# Altium PCB Interface-Board-v4.0.PcbDoc (part 2 of 3)
Units mil, origin at the board's own origin, x right, y up, seen from the top; angles counter-clockwise.
Board outline 1665.35 x 1665.35 mil, 4 copper layers (Top Layer, PWR, GND, Bottom Layer), stack 61.654 mil thick; 98 components, 76 nets, 345 pads, 193 vias.
Unrouted connection lines stored in the file: 69.
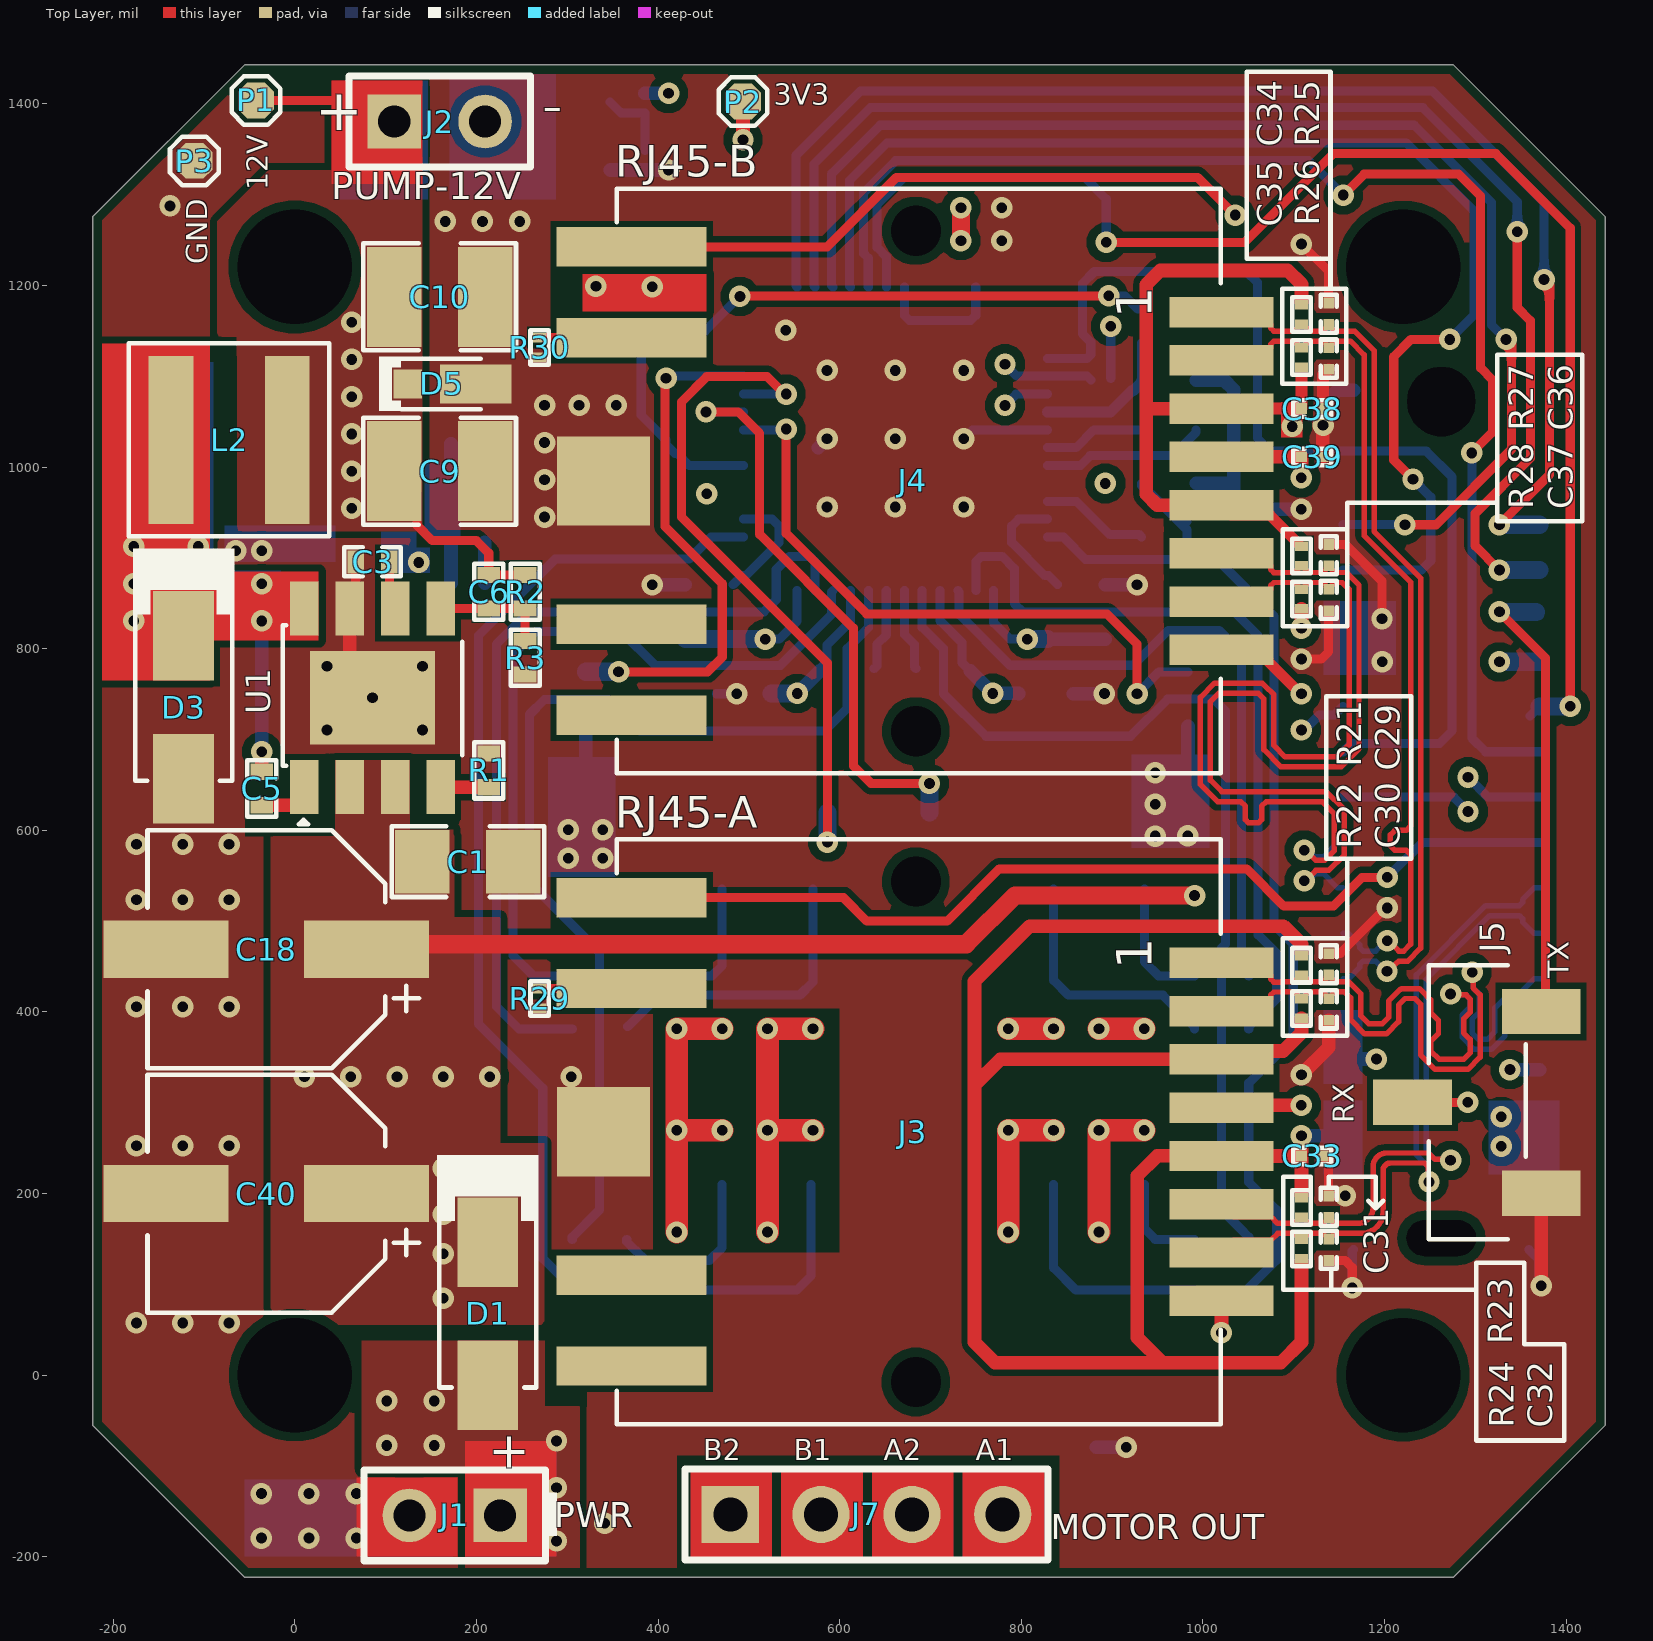
[diagram p0: Top Layer view]

## Part data (continued)
J7: "Gold 250V 3A Straight Square Pins 2.5mm 4P 260℃ 6mm -40℃~+105℃ 3mm 2.54mm Plugin Black Brass 1x4P Plugin,P=2.54mm Pin Headers ROHS", LCSC Part Number=C706876, Manufacturer=XKB, Package=Plugin,P=2.54mm, ComponentLink1Description=LCSC, ComponentLink1URL=https://www.lcsc.com/product-detail/Pin-Headers_XKB-Connectivity-X6511WV-04H-C60D30_C706876.html, Item Type="Male Header", Manufacturer Part Number=X6511WV-04H-C60D30
L1: library part FNR4030S3R9MT, "2.3A 3.9uH ±20% 3.3A SMD,4x4mm Power Inductors ROHS", LCSC Part Number=C167872, Manufacturer=cjiang, ComponentLink1Description=LCSC, ComponentLink1URL=https://www.lcsc.com/product-detail/Power-Inductors_cjiang-Changjiang-Microelectronics-Tech-FNR4030S3R9MT_C167872.html, Item Type=Inductor, Manufacturer Part Number=FNR4030S3R9MT
L2: library part FEXL0550A-150M, "3.9A 15uH Molding Choke ±20% 3.7A SMD,5.5x5.3mm Power Inductors ROHS", LCSC Part Number=C5378518, Manufacturer=cjiang, Package=SMD,5.5x5.3mm, ComponentLink1Description=LCSC, ComponentLink1URL=https://www.lcsc.com/product-detail/Power-Inductors_cjiang-Changjiang-Microelectronics-Tech-FEXL0550A-150M_C5378518.html, Item Type=Inductor, Manufacturer Part Number=FEXL0550A-150M
P1 P2 P3: "Test Point ON", Item Type="Test Point"
Q1: "MOSFET N-CH 20V 4.2A SOT23", LCSC Part Number=C2589, Manufacturer="Infineon Technologies", Package=SOT-23, ComponentLink2Description=LCSC, ComponentLink2URL=https://www.lcsc.com/product-detail/MOSFETs_Infineon-Technologies-IRLML2502TRPBF_C2589.html, Item Type=Mosfet, Manufacturer Part Number=IRLML2502TRPBF
R1: library part RT0402BRD0745K3L, "RES SMD 45.3KOHM 0.1% 1/16W 0402", Case Code (Imperial)=0402, Case Code (Metric)=1005, LCSC Part Number=C852795, Manufacturer=Yageo, Max Operating Temperature=155°C, Max Power Dissipation=63mW, Min Operating Temperature=-55°C, Power Rating=62.5mW, Supplier Part Number=4103245, Temperature Coefficient=25ppm/°C, Tolerance=0.1%, Voltage Rating=50V, Case/Package=0402, Category="Chip SMD Resistors", ComponentLink1Description=https://datasheet.ciiva.com/12796/pyu-rt-1-to-0-05-rohs-l-4-12796102.pdf?src-supplier=Mouser, ComponentLink1URL=https://datasheet.ciiva.com/12796/pyu-rt-1-to-0-05-rohs-l-4-12796102.pdf?src-supplier=Mouser, Height=0.3mm, Item Type=Resistor, Lead Free="Lead Free", Length=1mm, Manufacturer Part Number=RT0402BRD0745K3L, Number of Terminations=2, Packaging="Tape and Reel", Pricing="10000=0.0205, 20000=0.02, 30000=0.0197, 50000=0.0194, 100000=0.0187 (USD)", RoHS=Yes, RoHS Compliant=Yes, Series=RT, Stock=10000, Supplier="Future Electronics", Termination=SMD/SMT, Voltage Rating (DC)=50V, Weight=2.3E-05oz, Width=0.5mm
R2: library part RT0402BRD07150KL, "RES 150K OHM 0.1% 1/16W 0402", LCSC Part Number=C852538, Manufacturer=Yageo, Supplier Part Number=3102901, Category="Chip SMD Resistors", Item Type=Resistor, Manufacturer Part Number=RT0402BRD07150KL, Pricing="10000=0.0218, 20000=0.0213, 30000=0.021, 50000=0.0206, 100000=0.0199 (USD)", RoHS=Yes, RoHS Compliant=Yes, Stock=20000, Supplier="Future Electronics"
R3: library part RT0402BRD0710KL, "RES SMD 10K OHM 0.1% 1/16W 0402", LCSC Part Number=C190095, Manufacturer=Yageo, Supplier Part Number=1236728, Category="Chip SMD Resistors", ComponentLink1Description=https://datasheet.ciiva.com/12836/pyu-rt-1-to-0-05-rohs-l-4-12836454.pdf?src-supplier=Mouser, ComponentLink1URL=https://datasheet.ciiva.com/12836/pyu-rt-1-to-0-05-rohs-l-4-12836454.pdf?src-supplier=Mouser, Item Type=Resistor, Manufacturer Part Number=RT0402BRD0710KL, Pricing="10000=0.0218, 20000=0.0213, 30000=0.021, 50000=0.0206, 100000=0.0199 (USD)", RoHS=Yes, Stock=490000, Supplier="Future Electronics"
R4 R5: library part RC0201FR-0747KL, "RES 47K OHM 1% 1/20W 0201", Case Code (Imperial)=0201, Case Code (Metric)=0603, LCSC Part Number=C138139, Manufacturer=Yageo, Max Operating Temperature=125°C, Max Power Dissipation=50mW, Min Operating Temperature=-55°C, Package Quantity=10000, Resistance Tolerance=1%, Resistor Type="Thick Film", Supplier Part Number=7316417, Temperature Coefficient=200ppm/°C, Voltage Rating=25V, Case/Package=0201, Category="Chip SMD Resistors", ComponentLink1Description=https://datasheet.ciiva.com/7672/1563626-7672232.pdf?src-supplier=Element14, ComponentLink1URL=https://datasheet.ciiva.com/7672/1563626-7672232.pdf?src-supplier=Element14, ComponentLink2Description=https://datasheet.ciiva.com/29710/pyu-r-int-thick-7-29710919.pdf?src-supplier=Digi-Key, ComponentLink2URL=https://datasheet.ciiva.com/29710/pyu-r-int-thick-7-29710919.pdf?src-supplier=Digi-Key, ComponentLink3Description=https://datasheet.ciiva.com/29710/pyu-r-int-thick-7-29710920.pdf?src-supplier=Digi-Key, ComponentLink3URL=https://datasheet.ciiva.com/29710/pyu-r-int-thick-7-29710920.pdf?src-supplier=Digi-Key, ComponentLink4Description=https://datasheet.ciiva.com/25647/pyu-r-int-thick-7-25647310.pdf?src-supplier=Digi-Key, ComponentLink4URL=https://datasheet.ciiva.com/25647/pyu-r-int-thick-7-25647310.pdf?src-supplier=Digi-Key, ComponentLink5Description=https://datasheet.ciiva.com/26829/getdatasheetpartid-422496-26829867.pdf?src-supplier=Verical, ComponentLink5URL=https://datasheet.ciiva.com/26829/getdatasheetpartid-422496-26829867.pdf?src-supplier=Verical, ComponentLink6Description=https://datasheet.ciiva.com/8889/pyu-rc0201-51-rohs-l-8-8889065.pdf?src-supplier=Avnet, ComponentLink6URL=https://datasheet.ciiva.com/8889/pyu-rc0201-51-rohs-l-8-8889065.pdf?src-supplier=Avnet, Construction=Rectangular, Contact Plating=Tin,Matte, Depth=0.3mm, Features="Moisture Resistant", Height=0.01inch, Item Type=Resistor, Lead Free=5697LeadFree, Length=0.6mm, Manufacturer Part Number=RC0201FR-0747KL, Military Standard=Not, Number of Terminations=2, Packaging="Tape and Reel", Power Rating=50mW, Pricing="10000=0.0014, 50000=0.0013, 250000=0.0013, 750000=0.0012, 2000000=0.0011 (USD)", Reach SVHC Compliant=Unknown, RoHS=Yes, RoHS Compliant=Yes, Series=RC, Stock=1020000, Supplier="Future Electronics", Termination=SMD/SMT, Tolerance=1%, Weight=6E-06oz, Width=0.3mm
R6: library part RC0402FR-072R2L, "RES 2.2 OHM 1% 1/16W 0402", Case Code (Imperial)=0402, Case Code (Metric)=1005, LCSC Part Number=C327251, Manufacturer=Yageo, Max Operating Temperature=155°C, Max Power Dissipation=63mW, Min Operating Temperature=-55°C, Resistance Tolerance=1%, Resistor Type="Thick Film", Supplier Part Number 1=311-2.20LRCT-ND, Temperature Coefficient=200ppm/°C, Voltage Rating=50V, Case/Package=0402, Category="Chip SMD Resistors", ComponentLink1Description=https://datasheet.ciiva.com/11808/0900766b80c66297-11808447.pdf?src-supplier=RSComponents, ComponentLink1URL=https://datasheet.ciiva.com/11808/0900766b80c66297-11808447.pdf?src-supplier=RSComponents, ComponentLink2Description=https://datasheet.ciiva.com/7849/1018594-7849944.pdf?src-supplier=Element14, ComponentLink2URL=https://datasheet.ciiva.com/7849/1018594-7849944.pdf?src-supplier=Element14, ComponentLink3Description=https://datasheet.ciiva.com/7849/1018594-7849945.pdf?src-supplier=Element14, ComponentLink3URL=https://datasheet.ciiva.com/7849/1018594-7849945.pdf?src-supplier=Element14, ComponentLink4Description=https://datasheet.ciiva.com/12668/pyu-rc0402-51-rohs-l-6-r-12668221.pdf?src-supplier=Mouser, ComponentLink4URL=https://datasheet.ciiva.com/12668/pyu-rc0402-51-rohs-l-6-r-12668221.pdf?src-supplier=Mouser, ComponentLink5Description=https://datasheet.ciiva.com/17070/pyu-rc0402-51-rohs-l-6-r-17070495.pdf?src-supplier=Future+Electronics, ComponentLink5URL=https://datasheet.ciiva.com/17070/pyu-rc0402-51-rohs-l-6-r-17070495.pdf?src-supplier=Future+Electronics, Depth=0.5mm, Features="Moisture Resistant", Height=0.32mm, Lead Free="Lead Free", Length=1mm, Manufacturer Part Number=RC0402FR-072R2L, Number of Pins=2, Number of Terminations=2, Packaging="Tape and Reel", Power Rating=63mW, Pricing 1="1=0.10000, 10=0.02300, 100=0.00930, 1000=0.00416, 2500=0.00361, 5000=0.00298 (USD)", REACH SVHC="No SVHC", Resistance=2.2R, RoHS=Yes, RoHS Compliant=Yes, Series=RC, Size Code=0402, Stock 1=828995, Supplier 1=Digi-Key, Technology="THICK FILM", Termination=SMD/SMT, Tolerance=1%, Voltage Rating (DC)=50V, Width=0.5mm
R7 R8 R12 R13 R14 R15 R19 R20: library part RC0603FR-0722RL, "RES 22 OHM 1% 1/10W 0603", Case Code (Imperial)=0603, Case Code (Metric)=1608, LCSC Part Number=C107701, Manufacturer=Yageo, Max Operating Temperature=155°C, Max Power Dissipation=100mW, Min Operating Temperature=-55°C, Package Quantity=1, Resistance Tolerance=1%, Resistor Type="Thick Film", Temperature Coefficient=100ppm/°C, Voltage Rating=50V, Case/Package=0603, Category="Chip SMD Resistors", ComponentLink1Description=https://datasheet.ciiva.com/11819/0900766b80f96399-11819285.pdf?src-supplier=RSComponents, ComponentLink1URL=https://datasheet.ciiva.com/11819/0900766b80f96399-11819285.pdf?src-supplier=RSComponents, ComponentLink2Description=https://datasheet.ciiva.com/46395/443971-46395032.pdf?src-supplier=Element14, ComponentLink2URL=https://datasheet.ciiva.com/46395/443971-46395032.pdf?src-supplier=Element14, ComponentLink3Description=https://datasheet.ciiva.com/46440/1868787-46440901.pdf?src-supplier=Element14, ComponentLink3URL=https://datasheet.ciiva.com/46440/1868787-46440901.pdf?src-supplier=Element14, ComponentLink4Description=https://datasheet.ciiva.com/2454/pyu-r-int-thick-7-2454355.pdf?src-supplier=Digi-Key, ComponentLink4URL=https://datasheet.ciiva.com/2454/pyu-r-int-thick-7-2454355.pdf?src-supplier=Digi-Key, ComponentLink5Description=https://datasheet.ciiva.com/2454/pyu-r-int-thick-7-2454356.pdf?src-supplier=Digi-Key, ComponentLink5URL=https://datasheet.ciiva.com/2454/pyu-r-int-thick-7-2454356.pdf?src-supplier=Digi-Key, ComponentLink6Description=https://datasheet.ciiva.com/2454/pyu-r-int-thick-7-2454354.pdf?src-supplier=Digi-Key, ComponentLink6URL=https://datasheet.ciiva.com/2454/pyu-r-int-thick-7-2454354.pdf?src-supplier=Digi-Key, Construction=Rectangular, Depth=0.8mm, Features="Moisture Resistant", Height=0.022inch, Item Type=Resistor, Lead Free="Lead Free", Length=0.063inch, Manufacturer Part Number=RC0603FR-0722RL, Military Standard=Not, Number of Pins=2, Number of Terminations=2, Packaging="Tape and Reel", Power Rating=100mW, Pricing 1="5000=0.00133, 10000=0.00131, 20000=0.00127 (USD)", Reach SVHC Compliant=Yes, Resistance=22R, RoHS=Yes, RoHS Compliant=Yes, Series=RC, Size Code=0603, Stock 1=190000, Supplier 1=Avnet, Supplier Part Number 1=RC0603FR-0722RL, Technology="THICK FILM", Termination=SMD/SMT, Tolerance=1%, Voltage Rating (DC)=50V, Width=0.031inch
R9 R10 R16 R17: library part RC0603FR-0747RL, "RES SMD 47OHM 0.1W 0603", Case Code (Imperial)=0603, Case Code (Metric)=1608, LCSC Part Number=C114623, Manufacturer=Yageo, Max Operating Temperature=155°C, Max Power Dissipation=100mW, Min Operating Temperature=-55°C, Package Quantity=1, Resistance Tolerance=1%, Resistor Type="Thick Film", Supplier Part Number 1=311-47.0HRCT-ND, Temperature Coefficient=100ppm/°C, Voltage Rating=75V, Voltage Rating (DC)=50V, Case/Package=0603, Category="Chip SMD Resistors", ComponentLink1Description=https://datasheet.ciiva.com/2453/pyu-r-int-thick-7-2453922.pdf?src-supplier=Digi-Key, ComponentLink1URL=https://datasheet.ciiva.com/2453/pyu-r-int-thick-7-2453922.pdf?src-supplier=Digi-Key, ComponentLink2Description=https://datasheet.ciiva.com/2453/pyu-r-int-thick-7-2453923.pdf?src-supplier=Digi-Key, ComponentLink2URL=https://datasheet.ciiva.com/2453/pyu-r-int-thick-7-2453923.pdf?src-supplier=Digi-Key, ComponentLink3Description=https://datasheet.ciiva.com/2453/pyu-r-int-thick-7-2453924.pdf?src-supplier=Digi-Key, ComponentLink3URL=https://datasheet.ciiva.com/2453/pyu-r-int-thick-7-2453924.pdf?src-supplier=Digi-Key, ComponentLink4Description=https://datasheet.ciiva.com/7746/443971-7746363.pdf?src-supplier=Element14, ComponentLink4URL=https://datasheet.ciiva.com/7746/443971-7746363.pdf?src-supplier=Element14, ComponentLink5Description=https://datasheet.ciiva.com/7746/443971-7746364.pdf?src-supplier=Element14, ComponentLink5URL=https://datasheet.ciiva.com/7746/443971-7746364.pdf?src-supplier=Element14, ComponentLink6Description=https://datasheet.ciiva.com/46440/1868787-46440908.pdf?src-supplier=Element14, ComponentLink6URL=https://datasheet.ciiva.com/46440/1868787-46440908.pdf?src-supplier=Element14, Construction=Rectangular, Depth=0.8mm, Features="Moisture Resistant", Height=0.022inch, Lead Free="Lead Free", Length=1.6mm, Manufacturer Part Number=RC0603FR-0747RL, Military Standard=Not, Number of Pins=2, Number of Terminations=2, Packaging="Tape and Reel", Power Rating=100mW, Pricing 1="1=0.10000, 10=0.02400, 100=0.00970, 1000=0.00436, 2500=0.00378 (USD)", REACH SVHC=Unknown, Resistance=47R, RoHS=Yes, RoHS Compliant=Yes, Series=RC, Size Code=0603, Stock 1=596562, Supplier 1=Digi-Key, Termination=SMD/SMT, Tolerance=1%, Weight=7.1E-05oz, Width=0.8mm
R11 R18: library part ERJ-8BWFR075V, "RES 0.075 OHM 1% 1W 1206", Case Code (Imperial)=1206, Case Code (Metric)=3216, LCSC Part Number=C2909897, Manufacturer=Panasonic, Max Operating Temperature=155°C, Max Power Dissipation=1W, Min Operating Temperature=-55°C, Package Quantity=5000, Ratings=AEC-Q200, Resistance Tolerance=1%, Resistor Type="Thick Film", Supplier Part Number=667-ERJ-8BWFR075V, Temperature Coefficient=100ppm/°C, Case/Package=1206, Category="Chip SMD Resistors", ComponentLink1Description=https://datasheet.ciiva.com/11810/0900766b8126441d-11810144.pdf?src-supplier=Rs, ComponentLink1URL=https://datasheet.ciiva.com/11810/0900766b8126441d-11810144.pdf?src-supplier=Rs, ComponentLink2Description=https://datasheet.ciiva.com/5901/1662788-5901709.pdf?src-supplier=Farnell, ComponentLink2URL=https://datasheet.ciiva.com/5901/1662788-5901709.pdf?src-supplier=Farnell, ComponentLink3Description=https://datasheet.ciiva.com/7943/1662788-7943643.pdf?src-supplier=Element14, ComponentLink3URL=https://datasheet.ciiva.com/7943/1662788-7943643.pdf?src-supplier=Element14, ComponentLink4Description=https://datasheet.ciiva.com/5901/1662788-5901708.pdf?src-supplier=Farnell, ComponentLink4URL=https://datasheet.ciiva.com/5901/1662788-5901708.pdf?src-supplier=Farnell, ComponentLink5Description=https://datasheet.ciiva.com/24025/aoa0000ce3-72189-24025850.pdf?src-supplier=Mouser, ComponentLink5URL=https://datasheet.ciiva.com/24025/aoa0000ce3-72189-24025850.pdf?src-supplier=Mouser, ComponentLink6Description=https://datasheet.ciiva.com/9187/aoa0000ce3-9187670.pdf?src-supplier=Avnet, ComponentLink6URL=https://datasheet.ciiva.com/9187/aoa0000ce3-9187670.pdf?src-supplier=Avnet, ComponentLink7Description=https://datasheet.ciiva.com/30147/6aoa0000ce3-30147930.pdf?src-supplier=Onlinecomponents.com, ComponentLink7URL=https://datasheet.ciiva.com/30147/6aoa0000ce3-30147930.pdf?src-supplier=Onlinecomponents.com, Contact Plating=Tin, Depth=1.6mm, Features="Automotive AEC-Q200", Height=0.65mm, Item Type="Resistor Current Sense", Lead Free="Lead Free", Length=3.2mm, Manufacturer Part Number=ERJ-8BWFR075V, Mounting Technology="Surface Mount", Number of Terminations=2, Packaging="Tape and Reel", Pins=2, Power Rating=1W, Pricing="1=0.72, 10=0.385, 50=0.385, 100=0.337, 1000=0.215, 10000=0.178 (USD)", RoHS=Yes, Series=ERJ, Stock=148, Supplier=Mouser, Technology="THICK FILM", Termination=SMD/SMT, Tolerance=1%, Width=1.6mm
R21 R22 R23 R24 R25 R26 R27 R28: library part RC0201FR-0749R9L, "RES SMD 49.9 OHM 1% 1/20W 0201", Case Code (Imperial)=0201, Case Code (Metric)=0603, LCSC Part Number=C155744, Manufacturer=Yageo, Max Operating Temperature=125°C, Max Power Dissipation=50mW, Min Operating Temperature=-55°C, Resistor Type="Thick Film", Temperature Coefficient=200ppm/°C, Tolerance=1%, Voltage Rating=25V, Case/Package=0201, Category="Chip SMD Resistors", ComponentLink1Description=http://www.yageo.com/documents/recent/PYu-RC0201_51_RoHS_L_(8).pdf?src-supplier=Mouser, ComponentLink1URL=http://www.yageo.com/documents/recent/PYu-RC0201_51_RoHS_L_(8).pdf?src-supplier=Mouser, ComponentLink2Description=http://www.yageo.com/documents/recent/PYu-RC0201_51_RoHS_L_(8).pdf?src-supplier=Future+Electronics, ComponentLink2URL=http://www.yageo.com/documents/recent/PYu-RC0201_51_RoHS_L_(8).pdf?src-supplier=Future+Electronics, ComponentLink3Description=http://www.yageo.com/documents/recent/PYu-RC_Group_51_RoHS_L_10.pdf?src-supplier=Digi-Key, ComponentLink3URL=http://www.yageo.com/documents/recent/PYu-RC_Group_51_RoHS_L_10.pdf?src-supplier=Digi-Key, ComponentLink4Description=http://www.yageo.com/documents/recent/PYu-RC_Group_51_RoHS_L_9.pdf?src-supplier=Digi-Key, ComponentLink4URL=http://www.yageo.com/documents/recent/PYu-RC_Group_51_RoHS_L_9.pdf?src-supplier=Digi-Key, Construction=Rectangular, Depth=0.3mm, Features="Moisture Resistant", Height=0.01inch, Item Type=Resistor, Lead Free="Lead Free", Length=0.6mm, Manufacturer Part Number=RC0201FR-0749R9L, Military Standard=Not, Number of Terminations=2, Packaging="Tape and Reel", Power Rating=50mW, Pricing 1="10000=0.00128 (USD)", Resistance=49.9R, RoHS=Yes, RoHS Compliant=Yes, Series=RC, Size Code=0201, Stock 1=1020000, Supplier 1=Avnet, Supplier Part Number 1=RC0201FR-0749R9L, Termination=SMD/SMT, Width=0.012inch
R29 R30: library part RC0201DR-07330RL, "RES 330 OHM 0.5% 1/20W 0201", Case/Package=0201, LCSC Part Number=C851717, Manufacturer=Yageo, Max Operating Temperature=125°C, Max Power Dissipation=50mW, Min Operating Temperature=-55°C, Supplier Part Number 1=RC0201DR-07330RL-ND, Temperature Coefficient=200ppm/°C, Tolerance=0.5%, Category="Chip SMD Resistors", ComponentLink1Description=http://www.yageo.com.tw/exep/pages/download/literatures/PYu-R_INT-thick_7.pdf?src-supplier=Digi-Key, ComponentLink1URL=http://www.yageo.com.tw/exep/pages/download/literatures/PYu-R_INT-thick_7.pdf?src-supplier=Digi-Key, Features="Moisture Resistant", Height=0.01inch, Item Type=Resistor, Length=0.024inch, Manufacturer Part Number=RC0201DR-07330RL, Number of Terminations=2, Packaging="Tape and Reel", Pricing 1="10000=0.02267 (USD)", RoHS=Yes, RoHS Compliant=Yes, Series=RC, Supplier 1=Digi-Key, Width=0.012inch
R31: library part RC0201FR-0733RL, "RES 33 OHM 1% 1/20W 0201", LCSC Part Number=C295794, Manufacturer=Yageo, Supplier Part Number=6199285, Category="Chip SMD Resistors", ComponentLink1Description=https://datasheet.ciiva.com/2560/pyu-r-int-thick-7-2560877.pdf?src-supplier=Digi-Key, ComponentLink1URL=https://datasheet.ciiva.com/2560/pyu-r-int-thick-7-2560877.pdf?src-supplier=Digi-Key, ComponentLink2Description=https://datasheet.ciiva.com/2560/pyu-r-int-thick-7-2560878.pdf?src-supplier=Digi-Key, ComponentLink2URL=https://datasheet.ciiva.com/2560/pyu-r-int-thick-7-2560878.pdf?src-supplier=Digi-Key, ComponentLink3Description=https://datasheet.ciiva.com/2560/pyu-r-int-thick-7-2560879.pdf?src-supplier=Digi-Key, ComponentLink3URL=https://datasheet.ciiva.com/2560/pyu-r-int-thick-7-2560879.pdf?src-supplier=Digi-Key, ComponentLink4Description=https://datasheet.ciiva.com/7672/1563626-7672223.pdf?src-supplier=Element14, ComponentLink4URL=https://datasheet.ciiva.com/7672/1563626-7672223.pdf?src-supplier=Element14, ComponentLink5Description=https://datasheet.ciiva.com/22698/1563626-22698520.pdf?src-supplier=Element14, ComponentLink5URL=https://datasheet.ciiva.com/22698/1563626-22698520.pdf?src-supplier=Element14, Item Type=Resistor, Manufacturer Part Number=RC0201FR-0733RL, Pricing="10000=0.0013, 50000=0.0012, 250000=0.0012, 750000=0.0011, 2000000=0.001 (USD)", RoHS=Yes, Stock=1420000, Supplier="Future Electronics"
R32: library part RC0201FR-0710KL, "RES SMD 10K OHM 1% 1/20W 0201", LCSC Part Number=C106225, Manufacturer=Yageo, Package=0201, ComponentLink7Description=LCSC, ComponentLink7URL=https://www.lcsc.com/product-detail/Chip-Resistor-Surface-Mount_YAGEO-RC0201FR-0710KL_C106225.html, Item Type=Resistor, Manufacturer Part Number=RC0201FR-0710KL
U1: "IC REG BUCK ADJUSTABLE 3A 8SOPWR", LCSC Part Number=C136648, Manufacturer="Texas Instruments", Max Operating Temperature=125°C, Min Operating Temperature=-40°C, Quiescent Current=40uA, Supplier Part Number 1=296-47797-1-ND, Category="Voltage Regulators - Switching", ComponentLink1Description=http://www.ti.com/lit/ds/symlink/lmr16030.pdf?src-supplier=Digi-Key, ComponentLink1URL=http://www.ti.com/lit/ds/symlink/lmr16030.pdf?src-supplier=Digi-Key, ComponentLink2Description=http://www.ti.com/general/docs/suppproductinfo.tsp?distId=10&amp;gotoUrl=http%3A%2F%2Fwww.ti.com%2Flit%2Fgpn%2Flmr16030&src-supplier=Digi-Key, ComponentLink2URL=http://www.ti.com/general/docs/suppproductinfo.tsp?distId=10&amp;gotoUrl=http%3A%2F%2Fwww.ti.com%2Flit%2Fgpn%2Flmr16030&src-supplier=Digi-Key, Item Type=IC, Lead Free="Lead Free", Manufacturer Part Number=LMR16030SDDAR, Number of Pins=8, Pricing 1="1=4.08000, 10=3.66300, 25=3.46320, 100=3.00130, 250=2.84736, 500=2.55494, 1000=2.17800 (USD)", RoHS=Yes, RoHS Compliant=Yes, Stock 1=10434, Supplier 1=Digi-Key
U2: "IC REG BUCK 3.3V 2A TSOT26", LCSC Part Number=C780769, Manufacturer=Diodes, Supplier Part Number=6109504, Category="Voltage Regulators - Switching", ComponentLink1Description=https://www.diodes.com/assets/Datasheets/AP63200-AP63201-AP63203-AP63205.pdf?src-supplier=Digi-Key, ComponentLink1URL=https://www.diodes.com/assets/Datasheets/AP63200-AP63201-AP63203-AP63205.pdf?src-supplier=Digi-Key, Item Type=IC, Manufacturer Part Number=AP63203WU-7, Pricing="3000=0.34, 6000=0.335, 9000=0.33, 12000=0.33, 15000=0.32 (USD)", RoHS=Yes, Stock=3000, Supplier="Future Electronics"
U3: "IC MTR DRV BIPOLAR 10-50V 48TQFP", LCSC Part Number=C465948, Manufacturer=Trinamic, Supplier Part Number=700-TMC2160A-TA-T, Item Type=IC, Manufacturer Part Number=TMC2160A-TA-T, Pricing="1=6.21, 10=5.28, 50=5.28, 100=4.57, 1000=3.48, 10000=3.11 (USD)", RoHS=Yes, Stock=9328, Supplier=Mouser
U4 U5 U6 U7: "MOSFET 2N-CH 60V 9.5A 8SOIC", LCSC Part Number=C541719, Manufacturer="Alpha & Omega Semiconductor", Supplier Part Number=785-1792-1-ND, Category=Transistors, ComponentLink1Description=http://www.aosmd.com/res/data_sheets/AOSD62666E.pdf?src-supplier=Digi-Key, ComponentLink1URL=http://www.aosmd.com/res/data_sheets/AOSD62666E.pdf?src-supplier=Digi-Key, ComponentLink2Description=https://datasheet.octopart.com/AOSD62666E-Alpha-%26-Omega-Semiconductor-datasheet-136498378.pdf?src-supplier=LKR, ComponentLink2URL=https://datasheet.octopart.com/AOSD62666E-Alpha-%26-Omega-Semiconductor-datasheet-136498378.pdf?src-supplier=LKR, Item Type=MOSFET, Manufacturer Part Number=AOSD62666E, Pricing="1=1.11, 10=0.911, 100=0.7084, 500=0.60046, 1000=0.48914 (USD)", RoHS=No, Stock=12025, Supplier=Digi-Key

## Free pads (board coordinates)
  round 0 hole 125.98: MH2(0,0) MH3(0,1220.47) MH3(1220.47,0) MH3(1220.47,1220.47)

## Via types
v1: diameter 23.62, hole 11.81, Top Layer to Bottom Layer, tented both sides, 193 vias

## Nets (pads, with @x,y where several pads share a name; then routed paths per layer and width w, separated by ;. In a path a pad name is that pad's centre, name@x,y a point inside that pad or via, vN(x,y) a via of type N, cw(c..) or ccw(c..) an arc to the next point about the centre after c; other vN are vias at no path point)
3V3: C7.2 C8.2 D4.2 J6.A1 J6.A2 L1.2 P2.1 R4.1 R5.1 U2.1 U3.20 U3.21 U3.22 | length 245.2
  Top Layer w15: v1(493.56,1360.59) P2.1@493.56,1402.59
  Top Layer w20: v1(733.54,1249.36) v1(733.54,1285.59)
  Bottom Layer w10: R5.1@898.53,1097.87 R4.1@898.53,1126.15 v1(898.53,1155.09)
  Bottom Layer w15: v1(1328.68,284.7) 1335.94,284.7 1356.67,263.96 1356.67,283.92 1370.83,269.77 J6.A1@1370.83,236.56
  other v1: 1328.68,252.05 136.56,895 331.56,1199.13 393.56,1198.59
12V: C2.2 C6.2 C9.2 C10.2 C11.2 C16.2 D5.2 D6.2 J2.1 L2.2 P1.1 R2.2 U2.2 U2.3 U3.3 U3.4 | length 391.3
  Top Layer w10: P1.1@-42.8,1403.84 86.31,1403.84 J2.1@109.56,1380.59 ; C9.2@109.56,995.59 134.56,970.59 134.56,935.84 151.4,919 199.84,919 213.56,905.28 C6.2@213.56,881.25 ; C6.2@210.06,881.25 R2.2@253.56,881.25
  other v1: 62.56,954.59 453.56,970.59 62.56,995.59 62.56,1036.59 62.56,1077.59 62.56,1118.59 62.56,1159.59
BMA1: C19.2 C28.1 J7.4 U3.40 U4.3 U5.5 U5.6 | length 795.9
  Top Layer w25: v1(885.56,157.59) v1(885.56,269.59) v1(935.56,269.59) ; v1(885.56,381.43) v1(935.56,381.43)
  PWR w10: v1(768.66,750.79) 768.66,548.9 885.56,432 v1(885.56,381.43)
  Bottom Layer w10: U3.40@710.56,863.95 710.56,830.85 734.75,806.65 734.75,784.7 C19.2@743.86,775.59
  Bottom Layer w15: C19.2@743.86,775.59 v1(768.66,750.79) 797.01,750.79 C28.1@797.37,750.43
BMA2: C20.2 C27.1 J7.3 U3.37 U4.1 U5.7 U5.8 | length 910
  Top Layer w25: v1(785.56,157.59) v1(785.56,269.59) v1(835.56,269.59) ; v1(785.56,381.43) v1(835.56,381.43)
  PWR w10: v1(806.56,810.59) 751.34,810.59 735.7,794.95 735.7,535.55 835.56,435.7 v1(835.56,381.43)
  Bottom Layer w10: U3.37@769.61,863.95 769.62,828.63 787.65,810.59 v1(806.56,810.59)
  Bottom Layer w15: C20.2@828.67,810.59 C20.2@840.16,810.59 C27.1@892.61,810.59
  Bottom Layer w20: v1(806.56,810.59) C20.2@828.67,810.59
BMB1: C22.2 C26.1 J7.2 U3.48 U6.3 U7.5 U7.6 | length 1040.6
  Top Layer w25: v1(520.56,157.59) v1(520.56,269.59) ; v1(570.56,269.59) v1(520.56,269.59) ; v1(570.56,381.43) v1(520.56,381.43) v1(520.56,269.59)
  PWR w10: v1(518.04,810.59) 594.72,810.59 613.37,791.94 613.37,534.16 520.56,441.35 v1(520.56,381.43)
  Bottom Layer w10: v1(518.04,810.59) 533.24,810.59 553.08,830.43 U3.48@553.08,863.95
  Bottom Layer w20: C26.1@430.09,810.59 C22.2@482.56,810.59 v1(518.04,810.59)
BMB2: C23.2 C25.1 J7.1 U3.45 U6.1 U7.7 U7.8 | length 902.5
  Top Layer w25: v1(420.56,157.59) v1(420.56,269.59) ; v1(470.56,269.59) v1(420.56,269.59) ; v1(470.56,381.43) v1(420.56,381.43) v1(420.56,269.59)
  PWR w10: v1(470.56,381.43) 470.56,383.68 460.14,394.1 460.14,435.77 553.32,528.95 v1(553.32,750.79)
  Bottom Layer w10: C23.2@578.12,775.59 C23.2@578.12,778.09 586,785.97 586,803.92 612.13,830.06 U3.45@612.13,863.95
  Bottom Layer w15: C25.1@524.61,750.43 C25.1@524.96,750.79 ; v1(553.32,750.79) C23.2@578.12,775.59
  Bottom Layer w20: C25.1@524.96,750.79 v1(553.32,750.79)
CA1: C19.1 U3.42 | length 91.1
  Bottom Layer w10: U3.42@671.19,863.95 671.19,815.86 682.32,804.73 682.32,779.63 C19.1@683.86,778.09
CA2: C20.1 U3.35 | length 130.4
  Bottom Layer w10: U3.35@828.67,942.69 797.08,942.69 789.4,935.01 789.4,917.08 825.89,880.59 830.13,880.59 C20.1@840.16,870.59
CB1: C22.1 U3.2 | length 130.4
  Bottom Layer w10: C22.1@482.56,870.59 492.56,880.59 496.8,880.59 533.29,917.08 533.29,935.01 525.61,942.69 U3.2@494.02,942.69
CB2: C23.1 U3.43 | length 91.4
  Bottom Layer w10: C23.1@638.12,778.09 641.07,781.04 641.07,804.73 651.33,815 651.33,863.77 U3.43@651.5,863.95
DRV-CS: J6.A15 U3.13 | length 1473.9
  Top Layer w10: v1(1326.56,936.56) 1381.76,991.75 1381.76,1196.93 1375.78,1202.91 v1(1375.78,1206.59)
  Bottom Layer w10: U3.13@553.08,1198.59 551.81,1199.86 551.81,1343.15 623,1414.35 1252.77,1414.35 1375.78,1291.34 v1(1375.78,1206.59)
  Bottom Layer w20: v1(1326.56,936.56) J6.A15@1370.83,936.56
DRV-DIAG0: J6.B10 R4.2 U3.26 | length 1148.2
  Bottom Layer w10: U3.26@828.67,1119.85 872.54,1119.85 876.87,1124.18 R4.2@876.87,1126.15 876.56,1126.47 876.56,1137.75 867.34,1146.97 867.34,1202.17 880.62,1215.45 1048.05,1215.45 1059.99,1203.5 1059.99,1031.89 1074.18,1017.71 1245.99,1017.71 1274.56,989.14 1274.56,709.7 1260.39,695.53 1163.27,695.53 J6.B10@1154.29,686.56
DRV-DIAG1: J6.A9 R5.2 U3.27 | length 1068.2
  PWR w10: v1(782.09,1113.34) 1144.78,1113.34 1263.12,995 1263.12,687.46 v1(1291.99,658.59)
  Bottom Layer w10: v1(782.09,1113.34) 795.26,1100.17 U3.27@828.67,1100.17 872.54,1100.17 R5.2@876.87,1095.84 ; v1@1292.12,658.45 1314.02,636.56 J6.A9@1370.83,636.56
DRV-DIR: J6.A11 U3.18 | length 1578.1
  Top Layer w10: v1(893.56,1247.59) 1046.09,1247.59 1143.66,1345.16 1322.68,1345.16 1404.56,1263.28 v1(1404.56,736.56)
  Bottom Layer w10: U3.18@651.5,1198.59 651.5,1231.76 641.3,1241.96 641.3,1289.45 670.85,1319 869.73,1319 893.63,1295.1 893.63,1274.29 893.56,1274.22 v1(893.56,1247.59) ; J6.A11@1360.08,725.81 J6.A11@1370.83,736.56
  Bottom Layer w20: J6.A11@1370.83,736.56 v1(1404.56,736.56)
DRV-EN: J6.B11 U3.28 | length 773.7
  PWR w10: v1(782.09,1067.92) 1052.78,1067.92 1070.05,1050.66 1070.05,720.05 1079.61,710.49 v1(1108.56,710.49)
  Bottom Layer w10: v1(782.09,1067.92) 782.09,1068.21 794.36,1080.48 U3.28@828.67,1080.48 ; v1@1111.56,710.49 1128.12,727.04 1144.78,727.04 J6.B11@1154.29,736.56
DRV-MISO: J6.B14 U3.16 | length 1418.2
  Top Layer w10: v1(1231.41,986.56) 1210.16,1007.81 1210.16,1121.58 1229.17,1140.59 v1(1272,1140.59)
  Bottom Layer w10: U3.16@612.13,1198.59 611.04,1199.68 611.04,1315.78 652.33,1357.07 1223.95,1357.07 1298.53,1282.49 1298.53,1167.12 v1(1272,1140.59) ; J6.B14@1154.29,886.56 1240.56,886.56 1250.92,896.91 1250.92,967.05 v1(1231.41,986.56)
DRV-MOSI: J6.B15 U3.15 | length 1409.9
  Top Layer w10: v1(1222.56,936.59) v1(1222.56,936.59) 1256.81,936.56 1339.87,1019.61 1339.87,1130.93 1333.89,1136.91 v1(1333.89,1140.59)
  Bottom Layer w10: U3.15@592.45,1198.59 591.22,1199.82 591.22,1323.12 644.58,1376.48 1232.77,1376.48 1318.03,1291.23 1318.03,1156.45 v1(1333.89,1140.59) ; J6.B15@1154.29,936.56 1154.33,936.59 v1(1222.56,936.59)
DRV-SCK: J6.A14 U3.14 | length 1471.1
  Top Layer w10: v1(1326.56,886.59) 1299.73,913.42 1299.73,948.89 1360.7,1009.86 1360.7,1161.29 1346.21,1175.77 v1(1346.21,1259.21)
  Bottom Layer w10: U3.14@572.76,1198.59 571.58,1199.77 571.58,1333.64 633.88,1395.94 1242.3,1395.94 1346.21,1292.03 v1(1346.21,1259.21) ; J6.A14@1370.79,886.59 J6.A14@1370.83,886.56
  Bottom Layer w20: v1(1326.56,886.59) J6.A14@1370.79,886.59
DRV-STEP: J6.A10 U3.17 | length 1527.9
  Top Layer w10: v1(1154.56,1299.59) 1177.56,1322.59 1281.56,1322.59 1305.77,1298.38 1305.77,1109.23 1318.89,1096.11 1318.89,1038.28 v1(1296.2,1015.59)
  Bottom Layer w10: U3.17@631.82,1198.59 631.52,1198.89 631.52,1230.15 626.3,1235.37 626.3,1302.35 661.57,1337.62 1116.53,1337.62 v1(1154.56,1299.59) ; v1(1296.2,1015.59) 1296.2,701.68 1311.32,686.56 J6.A10@1370.83,686.56
GND: C1.1 C2.1 C3.1 C7.1 C8.1 C9.1 C10.1 C11.1 C12.1 C13.1 C16.1 C17.1 C18.2 C21.2 C24.2 C25.2 C26.2 C27.2 C28.2 C29.2 C30.2 C31.2 C32.2 C33.2 C34.2 C35.2 C36.2 C37.2 C38.2 C39.2 C40.2 D2.2 D3.2 D4.1 D5.1 J1.2 J3.EP J4.EP J5.3 J6.B12 J6.B13 J6.MP1 J6.MP2 J6.MP3 J6.MP4 P3.1 Q1.2 R1.1 R3.1 R10.2 R11.1 R17.2 R18.1 R29.1 R30.1 R32.1 U1.7 U1.9 U2.4 U3.6 U3.11 U3.12 U3.19 U3.23 U3.24 U3.30 U3.49 | length 2166.4
  Top Layer w10: U1.7@60.56,844.25 67.06,850.75 C3.1@67.06,900.59 ; v1(1108.56,788.59) 1130.4,788.59 1138.56,796.75 C37.2@1138.56,841.97 ; v1(1108.56,1245.59) 1138.56,1215.59 C34.2@1138.56,1180.63 ; C33.2@1132.18,241.43 1138.56,235.05 C31.2@1138.56,197.21 1138.69,197.34 1156.67,197.34 v1(1156.8,197.47) ; C32.2@1138.56,126.3 1156.62,126.3 1164.53,118.39 v1(1164.53,96.09) ; C29.2@1138.56,464.21 1138.84,464.49 1151.3,464.49 1201.4,514.59 v1(1203.09,514.59) ; C36.2@1138.56,914.88 1156.86,914.88 1197.29,874.46 v1(1197.29,832.95)
  Top Layer w13: v1@1132.18,1046.19 1132.18,1101.34 C35.2@1138.56,1107.72
  Top Layer w15: v1(35.56,710.59) 60.56,735.59 U1.7@60.56,844.25 ; v1(1108.56,330.99) 1138.56,360.99 C30.2@1138.56,390.99 ; C39.2@1132.18,1011.29 v1@1132.18,1046.13 ; v1@1132.18,1046.19 v1(1132.33,1046.03) ; v1(1372.5,98.54) J5.3@1372.5,200.48
  Bottom Layer w10: C25.2@464.61,750.43 v1@479.61,750.43 ; U3.19@671.19,1198.59 671.23,1198.55 671.23,1167.11 677.09,1161.25 744.02,1161.25 749.88,1167.11 749.88,1198.55 U3.23@749.93,1198.59 ; v1(736.54,1031.27) 746.39,1041.11 U3.30@828.67,1041.11 ; J6.B12@1154.29,786.56 J6.B12@1155.25,785.59 ; v1(1164.53,96.09) 1164.53,136.75 J6.MP3@1166.1,138.33 ; J6.MP4@1359.02,138.33 J6.MP4@1372.5,124.84
  Bottom Layer w15: C2.1@11.56,912.59 C2.1@14.56,915.59 ; R17.2@320.56,714.59 R18.1@320.56,645.59 339,627.15 v1(339,569.34) ; Q1.2@347.3,1327.19 R32.1@385.56,1327.19 v1(411.56,1327.19) ; v1(393.56,870.59) C26.2@430.09,870.59 ; U3.49@576.31,1021.43 v1(586.15,1031.27) ; C28.2@857.37,750.43 857.45,750.51 891.48,750.51 v1(891.56,750.59) ; 882.56,-79.41 v1(915.56,-79.41) ; C27.2@892.61,870.59 v1(927.56,870.59) ; R11.1@977.56,640.59 983.56,646.59 R10.2@983.56,714.59 ; C17.1@992.56,982.06 1033.97,982.06 1033.97,1085.17 1023.31,1095.84 C13.1@992.56,1095.84 ; 1033.97,981.3 1033.97,968.4 1048.78,953.59 v1(1108.24,953.59) ; v1(1132.33,1046.03) 1132.33,1068.66 1148.46,1084.78 J6.MP2@1166.1,1084.78 ; J6.B12@1155.25,785.59 1155.74,786.07 J6.B12@1155.74,790.6 ; J6.B12@1155.33,791 1164.64,791 1197.29,823.64 v1(1197.29,832.95) ; v1(1372.5,98.54) J6.MP4@1372.5,124.84
  other v1: -36.75,-179.41 15.56,-179.41 67.87,-179.41 341.42,-163.01 -36.75,-130.42 15.56,-130.42 67.87,-130.42 -174.43,57.52 -123.44,57.52 -72.46,57.52 -174.43,252.59 -123.44,252.59 -72.46,252.59 304.56,328.59 -174.43,405.59 -123.44,405.59 -72.46,405.59 -174.43,523.59 -123.44,523.59 -72.46,523.59 301,569.34 -174.43,584.59 -123.44,584.59 -72.46,584.59 947.56,593.69 983.24,594.01 301,600.59 339,600.59 947.56,628.59 947.56,663.49 140.56,710.59 85.56,745.92 486.61,750.43 35.56,780.59 140.56,780.59 1197.39,785.59 -65.17,908 -36.44,908 275.06,945.02 586.15,956.07 661.35,956.07 736.54,956.07 275.06,986.02 275.06,1027.02 661.35,1031.27 275.06,1068.02 313.06,1068.02 354.06,1068.02 586.15,1106.47 661.35,1106.47 736.54,1106.47 540.56,1150.59 778.56,1249.36 165.56,1270.59 206.56,1270.59 247.56,1270.59 778.56,1285.59 -137.44,1287.59
GND_ETH: C39.1 J3.4 J3.8 J4.4 J4.8 | length 1412.2
  Top Layer w12: J4.8@1020.47,798.69 1060.83,798.69 1071.56,787.96 1071.56,786.26 1105.16,752.66 1108.6,752.66 v1@1110.83,750.43
  Top Layer w15: v1(1020.47,46.59) J3.8@1020.47,81.98 ; J3.4@1020.47,294.58 1023.2,297.3 v1(1108.37,297.3) ; J4.4@1020.47,1011.29 C39.1@1108.56,1011.29 v1@1108.56,988.52
  GND w15: v1(1020.47,46.59) 1072.56,98.68 1072.56,297.3 ; v1(1108.24,988.2) 1106.59,986.56 1083.52,986.56 1072.56,975.59 1072.56,750.43 ; v1(1108.37,297.3) 1072.56,297.3 ; v1@1110.83,750.43 1072.56,750.43 ; 1072.56,297.3 1072.56,750.43
  other v1: 1108.56,750.43
HA1: R7.1 U3.41 | length 1071.7
  Bottom Layer w10: U3.41@690.87,863.95 690.87,823.57 714.34,800.1 714.34,750.53 761.28,703.59 920.23,703.59 961.23,744.59 1011.77,744.59 1024.8,731.55 1024.8,474.69 1020.45,470.34 1020.45,182.2 1040.56,162.09 1050.56,152.09 R7.1@1050.56,149.59
HA2: R12.2 U3.36 | length 1082.5
  Bottom Layer w10: U3.36@828.67,923 846.39,923 847.68,921.7 847.68,921.37 870.93,898.12 1016.1,898.12 1078.41,835.81 1078.41,495.72 1099.56,474.57 1099.56,370.61 1050.56,321.61 1050.56,212.57 1080.93,182.2 1080.93,126.47 1050.56,96.09 R12.2@1050.56,93.59
HB1: R14.1 U3.1 | length 1100.2
  Bottom Layer w10: R14.1@305.56,93.59 305.56,96.09 273,128.65 273,316.03 202.49,386.54 202.49,814.69 286.61,898.81 434.28,898.81 458.3,922.83 493.85,922.83 U3.1@494.02,923
HB2: R19.2 U3.44 | length 1143
  Bottom Layer w10: R19.2@305.56,149.59 305.56,152.09 335.56,182.09 335.56,465.94 258.43,543.07 258.43,727.55 274.86,743.98 345.62,743.98 380.1,709.5 583.63,709.5 608.35,734.23 608.35,800.1 631.82,823.57 U3.44@631.82,863.95
LA1: R8.1 U3.39 | length 746.2
  Bottom Layer w10: U3.39@730.24,863.95 731.54,862.65 731.54,837.87 787.6,781.82 923.53,781.82 962,820.29 1017.72,820.29 1042.59,795.42 1042.59,447.56 R8.1@1050.56,439.59
LA2: R13.2 U3.38 | length 858.3
  Bottom Layer w10: U3.38@749.93,863.95 749.93,895.89 755.79,901.75 779.07,901.75 792.51,888.31 792.51,849.59 801.5,840.59 1034.63,840.59 1060.82,814.39 1060.82,484.93 1081.3,464.46 1081.3,414.67 1050.56,383.93 R13.2@1050.56,381.43
LB1: R15.1 U3.47 | length 937.1
  Bottom Layer w10: R15.1@305.56,381.43 246.65,381.43 222.03,406.06 222.03,804.78 257.84,840.59 516.64,840.59 530.19,854.14 530.19,887.26 544.67,901.75 566.91,901.75 572.76,895.89 U3.47@572.76,863.95